# Altium PCB Sampler_DIOT.PCBDOC (part 7 of 11)
Units mm, origin at the board's own origin, x right, y up, seen from the top; angles counter-clockwise.
Board outline 222.9 x 100 mm, 4 copper layers (L1, P2, L3, L4), stack 1.6 mm thick; 754 components, 442 nets, 2347 pads, 1230 vias.
Unrouted connection lines stored in the file: 10.
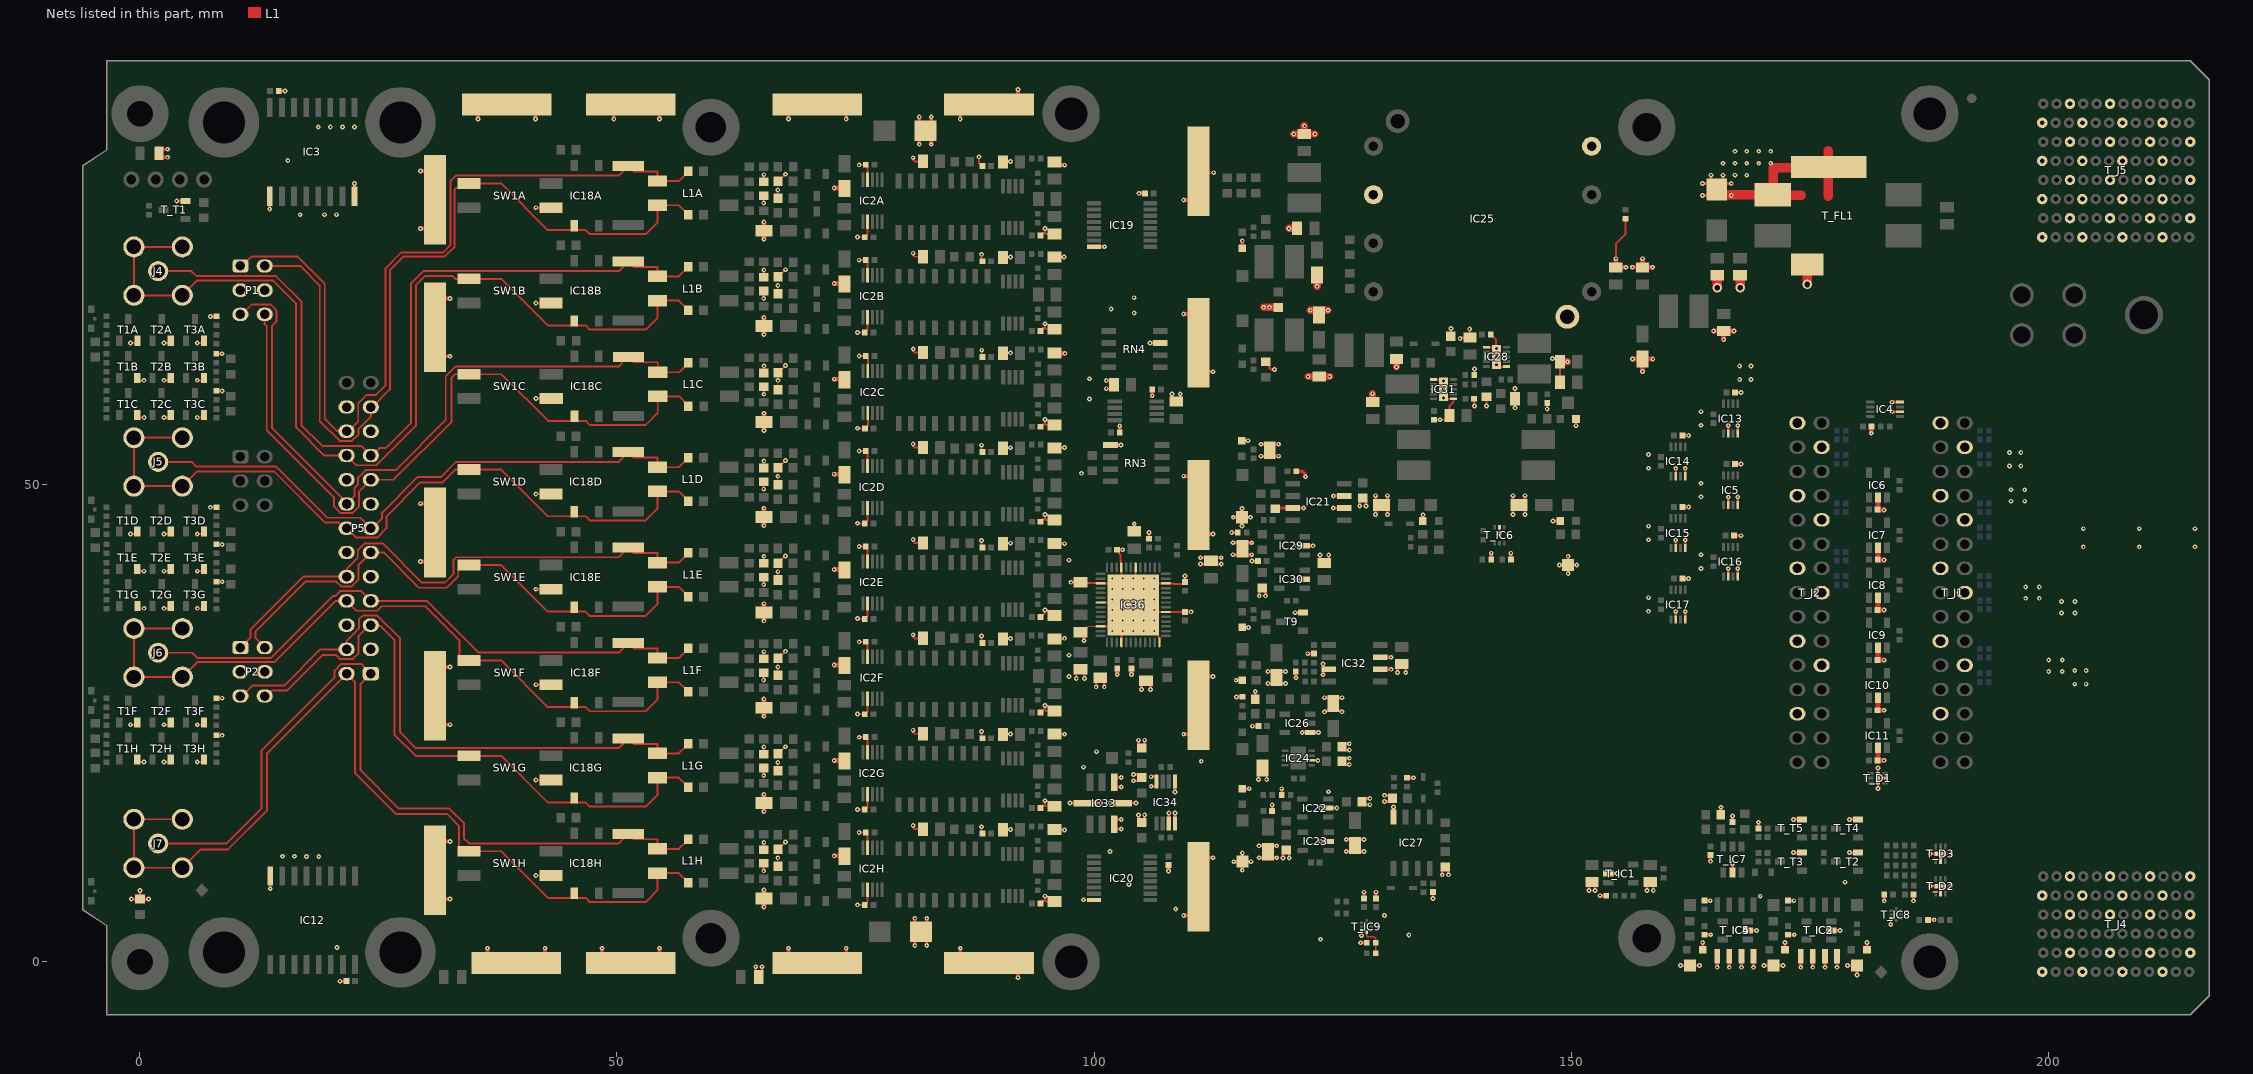
[diagram p8: the nets of this part, all layers, seen from the top]

## Via types
v1: diameter 0.5, hole 0.2, L1 to L4, tented both sides, 1208 vias
v2: diameter 1, hole 0.6, L1 to L4, tented both sides, 16 vias
v3: diameter 0.6, hole 0.3, L1 to L4, tented both sides, 6 vias

## Nets (pads, with @x,y where several pads share a name; then routed paths per layer and width w, separated by ;. In a path a pad name is that pad's centre, name@x,y a point inside that pad or via, vN(x,y) a via of type N, cw(c..) or ccw(c..) an arc to the next point about the centre after c; other vN are vias at no path point) (continued)
GND: C1A.1 C1B.1 C1C.1 C1D.1 C1E.1 C1F.1 C1G.1 C1H.1 C3A.1 C3B.1 C3C.1 C3D.1 C3E.1 C3F.1 C3G.1 C3H.1 C4A.1 C4B.1 C4C.1 C4D.1 C4E.1 C4F.1 C4G.1 C4H.1 C5A.1 C5B.1 C5C.1 C5D.1 C5E.1 C5F.1 C5G.1 C5H.1 C7A.2 C7B.2 C7C.2 C7D.2 C7E.2 C7F.2 C7G.2 C7H.2 C8A.2 C8B.2 C8C.2 C8D.2 C8E.2 C8F.2 C8G.2 C8H.2 C9A.1 C9B.1 C9C.1 C9D.1 C9E.1 C9F.1 C9G.1 C9H.1 C10A.1 C10B.1 C10C.1 C10D.1 C10E.1 C10F.1 C10G.1 C10H.1 C11A.1 C11B.1 C11C.1 C11D.1 C11E.1 C11F.1 C11G.1 C11H.1 C12A.1 C12B.1 C12C.1 C12D.1 C12E.1 C12F.1 C12G.1 C12H.1 C13A.1 C13B.1 C13C.1 C13D.1 C13E.1 C13F.1 C13G.1 C13H.1 C14A.1 C14B.1 C14C.1 C14D.1 C14E.1 C14F.1 C14G.1 C14H.1 C15.1 C16.1 C17.1 C18.1 C19.1 C20.1 C21.1 C22.1 C23.1 C24.1 C25.1 C26.1 C27.1 C28.1 C29.1 C30.1 C31.1 C32.1 C33.1 C37.1 C38.2 C39.1 C41.1 C43.1 C44.2 C45.1 C47.2 C48.1 C49.1 C50.2 C51.1 C52.2 C53.1 C54.1 C55.1 C56.1 C57.1 C58.1 C59.1 C60.1 C61.1 C62.1 C63.1 C64.1 C65.1 C66.1 C67.2 C68.1 C69.1 C70.1 C71.1 C72.1 C73.1 C74.1 C76.1 C77.2 C78.1 C79.1 C80.2 C81.1 C83.1 C84.2 C85.1 C86.1 C87.1 C88.1 C89.1 C90.1 C91.1 C92.1 C93.1 C94.1 C95.1 C96.1 C97.1 C98.1 C99.1 C100.1 C101.1 C102.1 C103.1 C104.1 C105.1 C106.1 CLIP1.1 CLIP2.1 CLIP3.1 CLIP4.1 CLIP5.1 CLIP6.1 CLIP7.1 CLIP8.1 CLIP9.1 CLIP10.1 CLIP11.1 CLIP12.1 CLIP13.1 CLIP14.1 CLIP15.1 CLIP16.1 CLIP17.1 CLIP18.1 D5.2 D6.1 IC2A.2 IC2A.9 IC2B.2 IC2B.9 IC2C.2 IC2C.9 IC2D.2 IC2D.9 IC2E.2 IC2E.9 IC2F.2 IC2F.9 IC2G.2 IC2G.9 IC2H.2 IC2H.9 IC3.1 IC3.8 IC4.2 IC4.4 IC5.2 IC5.4 IC6.2 IC7.2 IC8.2 IC9.2 IC10.2 IC11.2 IC12.8 IC13.2 IC13.4 IC14.2 IC14.4 IC15.2 IC15.4 IC16.2 IC16.4 IC17.2 IC17.4 IC19.8 IC20.8 IC21.3 IC21.6 IC21.7 IC22.2 IC23.2 IC24.6 IC25.3 IC25.5 IC25.8 IC26.1 IC27.4 IC28.1 IC28.6 IC28.11 IC29.2 IC30.2 IC31.1 IC31.6 IC31.11 IC32.3 IC32.6 IC32.7 IC33.3 IC33.4 IC33.5 IC33.8 IC34.3 IC34.4 IC34.5 IC34.8 IC36.3 IC36.7 IC36.12 IC36.18 IC36.26 IC36.32 IC36.38 IC36.46 IC36.49 IC36.53 LD1.1 LD2.1 LD3.1 LD4.1 LD5.1 LD6.1 LD7.1 LD8.1 LD9.1 LD10.1 LD11.1 P1.3 P1.4 P2.3 P2.4 P5.3 P5.6 P5.9 P5.12 P5.15 P5.18 P5.21 P5.24 R4A.1 R4B.1 R4C.1 R4D.1 R4E.1 R4F.1 R4G.1 R4H.1 R11A.1 R11B.1 R11C.1 R11D.1 R11E.1 R11F.1 R11G.1 R11H.1 R33A.1 R33B.1 R33C.1 R33D.1 R33E.1 R33F.1 R33G.1 R33H.1 R35.1 R52.1 R55.1 R57.1 R62.1 R63.1 R68.1 R71.1 R74.1 R92.2 R94.2 RN3.1 RN4.7 SW1A.3 SW1B.3 SW1C.3 SW1D.3 SW1E.3 SW1F.3 SW1G.3 SW1H.3 T1A.2 T1B.2 T1C.2 T1D.2 T1E.2 T1F.2 T1G.2 T1H.2 T2A.2 T2B.2 T2C.2 T2D.2 T2E.2 T2F.2 T2G.2 T2H.2 T3A.2 T3B.2 T3C.2 T3D.2 T3E.2 T3F.2 T3G.2 T3H.2 T9.2 T_C1.1 T_C2.1 T_C3.1 T_C4.1 T_C5.1 T_C6.1 T_C8.1 T_C9.1 T_C10.1 T_C12.1 T_C13.2 T_C16.1 T_C20.1 T_C22.1 T_C23.1 T_C24.1 T_C25.1 T_D1.2 T_D1.7 T_D2.2 T_D2.7 T_D3.2 T_D3.7 T_D5.2 T_FL1.4 T_IC1.2 T_IC2.2 T_IC3.1 T_IC3.2 T_IC3.3 T_IC3.4 T_IC4.2 T_IC5.1 T_IC5.2 T_IC5.3 T_IC5.4 T_IC6.2 T_IC7.2 T_IC8.4 T_IC9.4 T_J1.1 T_J1.4 T_J1.7 T_J1.10 T_J1.13 T_J1.16 T_J1.19 T_J1.22 T_J1.25 T_J2.1 T_J2.4 T_J2.7 T_J2.10 T_J2.13 T_J2.16 T_J2.19 T_J2.22 T_J2.25 T_J4.A2 T_J4.A4 T_J4.A6 T_J4.C1 T_J4.C5 T_J4.D2 T_J4.D4 T_J4.D6 T_J4.F1 T_J4.F5 T_J4.G2 T_J4.G4 T_J4.G6 T_J4.I1 T_J4.I5 T_J4.J2 T_J4.J4 T_J4.J6 T_J4.L1 T_J4.L5 T_J5.A2 T_J5.A4 T_J5.A6 T_J5.C1 T_J5.C3 T_J5.C5 T_J5.C7 T_J5.D2 T_J5.D4 T_J5.D6 T_J5.F1 T_J5.F3 T_J5.F5 T_J5.F7 T_J5.G2 T_J5.G4 T_J5.G6 T_J5.G8 T_J5.I1 T_J5.I3 T_J5.I5 T_J5.I7 T_J5.J2 T_J5.J4 T_J5.J6 T_J5.J8 T_J5.L1 T_J5.L3 T_J5.L5 T_J5.L7 T_R6.1 T_R7.1 T_R9.1 T_R19.1 T_R25.1 T_R26.2 T_R27.2 T_T1.2 T_T2.2 T_T3.2 T_T4.2 T_T5.2 TP3.1 TP4.1 TP5.1 TP6.1 TP14.1 TP16.1 | length 573.9
  L1 w0.127: C5H.1@66.862,10.02 v1(66.862,10.897) ; C5G.1@66.862,20.02 v1(66.862,20.897) ; C5F.1@66.862,30.02 v1(66.862,30.897) ; C5E.1@66.862,40.02 v1(66.862,40.897) ; C5D.1@66.862,50.02 v1(66.862,50.897) ; C5B.1@66.862,70.02 v1(66.862,70.897) ; C5A.1@66.862,80.02 v1(66.862,80.897) ; C5C.1@66.875,60.076 v1(66.875,60.953) ; C96.1@98.569,34.566 98.78,34.566 99.396,35.182 100.001,35.182 100.022,35.161 100.685,35.161 IC36.12@100.689,35.165 ; v1(98.897,6.508) 99.977,6.508 IC20.8@99.999,6.487
  L1 w0.203: v1@-0.997,24.846 v1@-0.99,24.854 ; v1@-0.997,44.846 v1@-0.99,44.854 ; v1@-0.997,64.846 v1@-0.99,64.854 ; v1@-0.99,24.85 -0.533,24.85 T1F.2@-0.283,25.1 ; v1@-0.99,44.85 -0.533,44.85 T1D.2@-0.283,45.1 ; v1@-0.99,64.85 -0.533,64.85 T1A.2@-0.283,65.1 ; T1H.2@-0.28,21.2 -0.03,20.95 v1@0.426,20.95 ; T1E.2@-0.28,41.2 -0.03,40.95 v1@0.426,40.95 ; T1B.2@-0.28,61.2 -0.03,60.95 v1@0.426,60.95 ; T1G.2@-0.275,37.3 -0.025,37.05 v1@0.431,37.05 ; T1C.2@-0.275,57.3 -0.025,57.05 v1@0.431,57.05 ; v1@0.426,20.954 v1@0.433,20.946 ; v1@0.426,40.954 v1@0.433,40.946 ; v1@0.426,60.954 v1@0.433,60.946 ; v1@0.431,37.053 v1@0.438,37.046 ; v1@0.431,57.054 v1@0.438,57.046 ; v1@2.503,24.846 v1@2.51,24.854 ; v1@2.503,44.846 v1@2.51,44.854 ; v1@2.503,64.846 v1@2.51,64.854 ; v1@2.506,20.946 v1@2.513,20.954 ; v1@2.506,40.946 v1@2.513,40.954 ; v1@2.506,60.946 v1@2.513,60.954 ; v1@2.51,24.85 2.967,24.85 T2F.2@3.217,25.1 ; v1@2.51,44.85 2.967,44.85 T2D.2@3.217,45.1 ; v1@2.51,64.85 2.967,64.85 T2A.2@3.217,65.1 ; v1@2.512,37.046 v1@2.519,37.053 ; v1@2.512,57.046 v1@2.519,57.054 ; v1@2.513,20.95 2.97,20.95 T2H.2@3.22,21.2 ; v1@2.513,40.95 2.97,40.95 T2E.2@3.22,41.2 ; v1@2.513,60.95 2.97,60.95 T2B.2@3.22,61.2 ; v1@2.519,37.05 2.975,37.05 T2G.2@3.225,37.3 ; v1@2.519,57.05 2.975,57.05 T2C.2@3.225,57.3 ; v1@6.003,24.846 v1@6.01,24.854 ; v1@6.003,44.846 v1@6.01,44.854 ; v1@6.003,64.846 v1@6.01,64.854 ; v1@6.006,20.946 v1@6.013,20.954 ; v1@6.006,40.946 v1@6.013,40.954 ; v1@6.006,60.946 v1@6.013,60.954 ; v1@6.01,24.85 6.467,24.85 T3F.2@6.717,25.1 ; v1@6.01,44.85 6.467,44.85 T3D.2@6.717,45.1 ; v1@6.01,64.85 6.467,64.85 T3A.2@6.717,65.1 ; v1@6.012,37.046 v1@6.019,37.053 ; v1@6.012,57.046 v1@6.019,57.054 ; v1@6.013,20.95 6.47,20.95 T3H.2@6.72,21.2 ; v1@6.013,40.95 6.47,40.95 T3E.2@6.72,41.2 ; v1@6.013,60.95 6.47,60.95 T3B.2@6.72,61.2 ; v1@6.019,37.05 6.475,37.05 T3G.2@6.725,37.3 ; v1@6.019,57.05 6.475,57.05 T3C.2@6.725,57.3 ; v1(7.387,47.638) 7.394,47.645 R33D.1@8,47.645 ; v1(7.387,67.638) 7.394,67.645 R33A.1@8,67.645 ; R33B.1@7.994,63.745 8.601,63.745 v1(8.608,63.738) ; R33H.1@8,23.745 8.606,23.745 v1(8.613,23.738) ; R33F.1@8,27.645 8.606,27.645 v1(8.613,27.638) ; R33G.1@8,39.845 8.606,39.845 v1(8.613,39.838) ; R33E.1@8,43.745 v1@8.606,43.745 ; R33C.1@8,59.845 8.606,59.845 v1(8.613,59.838) ; v1@13.602,78.912 v1@13.609,78.919 ; v1@13.651,7.662 v1@13.659,7.669 ; v1@15.199,91.271 v1@15.206,91.264 ; v1@20.974,-2.027 v1@20.981,-2.034 ; v1@22.492,81.581 v1@22.499,81.588 ; v1@29.401,41.971 v1@29.409,41.979 ; v1@29.401,48.029 v1@29.409,48.021 ; v1@29.401,76.851 v1@29.409,76.859 ; v1@29.401,82.909 v1@29.409,82.901 ; v1@32.479,6.579 v1@32.487,6.571 ; v1@32.479,12.621 v1@32.487,12.629 ; v1@32.479,24.859 v1@32.487,24.851 ; v1@32.479,30.901 v1@32.487,30.909 ; v1@32.479,63.479 v1@32.487,63.471 ; v1@32.479,69.521 v1@32.487,69.529 ; v1@35.415,88.337 v1@35.423,88.345 ; v1@36.415,1.423 v1@36.423,1.415 ; v1@41.465,88.345 v1@41.473,88.337 ; v1@42.465,1.415 v1@42.473,1.423 ; v1@48.415,1.423 v1@48.423,1.415 ; v1@49.665,88.337 v1@49.673,88.345 ; v1@54.465,1.415 v1@54.473,1.423 ; v1@54.465,88.345 v1@54.473,88.337 ; v1(65.376,9.54) R11H.1@65.376,10.312 ; R4H.1@65.376,11.76 v1@65.376,12.52 ; v1(65.376,19.54) R11G.1@65.376,20.312 ; R4G.1@65.376,21.76 v1@65.376,22.52 ; v1(65.376,29.54) R11F.1@65.376,30.312 ; R4F.1@65.376,31.76 v1@65.376,32.52 ; v1(65.376,39.54) R11E.1@65.376,40.312 ; R4E.1@65.376,41.76 v1@65.376,42.52 ; v1(65.376,49.54) R11D.1@65.376,50.312 ; R4D.1@65.376,51.76 v1@65.376,52.52 ; v1(65.376,69.54) R11B.1@65.376,70.312 ; R4B.1@65.376,71.76 v1@65.376,72.52 ; v1(65.376,79.54) R11A.1@65.376,80.312 ; R4A.1@65.376,81.76 v1@65.376,82.52 ; v1(65.389,59.496) R11C.1@65.389,60.268 ; R4C.1@65.389,61.716 v1@65.389,62.476 ; C1H.1@66.862,11.798 v1@67.612,12.548 ; C1G.1@66.862,21.798 v1@67.612,22.548 ; C1F.1@66.862,31.798 v1@67.612,32.548 ; C1E.1@66.862,41.798 v1@67.612,42.548 ; C1D.1@66.862,51.798 v1@67.612,52.548 ; C1B.1@66.862,71.798 v1@67.612,72.548 ; C1A.1@66.862,81.798 v1@67.612,82.548 ; C1C.1@66.875,61.754 v1@67.625,62.504 ; v1@67.971,1.423 v1@67.979,1.415 ; v1@67.971,88.337 v1@67.979,88.345 ; C8H.2@73.773,11.113 C8H.2@73.829,11.058 ; C8G.2@73.773,21.113 C8G.2@73.829,21.058 ; v1@74.021,1.415 v1@74.029,1.423 ; v1@74.021,88.345 v1@74.029,88.337 ; v1(75.199,5.974) 75.224,5.948 C10H.1@75.965,5.948 76.275,6.258 IC2H.2@76.275,7.567 ; v1(75.199,15.974) 75.224,15.948 C10G.1@75.965,15.948 76.275,16.258 IC2G.2@76.275,17.567 ; v1(75.199,25.974) 75.224,25.948 C10F.1@75.965,25.948 76.275,26.258 IC2F.2@76.275,27.567 ; v1(75.199,35.974) 75.224,35.948 C10E.1@75.965,35.948 76.275,36.258 IC2E.2@76.275,37.567 ; v1(75.199,45.974) 75.224,45.948 C10D.1@75.965,45.948 76.275,46.258 IC2D.2@76.275,47.567 ; v1(75.199,65.974) 75.224,65.948 C10B.1@75.965,65.948 76.275,66.258 IC2B.2@76.275,67.567 ; v1(75.199,75.974) 75.224,75.948 C10A.1@75.965,75.948 76.275,76.258 IC2A.2@76.275,77.567 ; v1(75.211,55.93) 75.237,55.904 C10C.1@75.978,55.904 76.288,56.214 IC2C.2@76.288,57.523 ; v1(75.387,13.543) 75.394,13.55 C9H.1@76.075,13.55 ; v1(75.387,23.543) 75.394,23.55 C9G.1@76.075,23.55 ; v1(75.387,33.543) 75.394,33.55 C9F.1@76.075,33.55 ; v1(75.387,43.543) 75.394,43.55 C9E.1@76.075,43.55 ; v1(75.387,53.543) 75.394,53.55 C9D.1@76.075,53.55 ; v1(75.387,63.493) 75.394,63.5 C9C.1@76.075,63.5 ; v1(75.387,73.543) 75.394,73.55 C9B.1@76.075,73.55 ; v1(75.387,83.543) 75.394,83.55 C9A.1@76.075,83.55 ; C9H.1@76.065,13.448 76.275,13.238 IC2H.9@76.275,11.967 ; C9G.1@76.065,23.448 76.275,23.238 IC2G.9@76.275,21.967 ; C9F.1@76.065,33.448 76.275,33.238 IC2F.9@76.275,31.967 ; C9E.1@76.065,43.448 76.275,43.238 IC2E.9@76.275,41.967 ; C9D.1@76.065,53.448 76.275,53.238 IC2D.9@76.275,51.967 ; C9B.1@76.065,73.448 76.275,73.238 IC2B.9@76.275,71.967 ; C9A.1@76.065,83.448 76.275,83.238 IC2A.9@76.275,81.967 ; C9C.1@76.078,63.404 76.288,63.194 IC2C.9@76.288,61.923 ; v1(81.044,14.28) 81.044,14.055 81.194,13.905 C3H.1@82.069,13.905 ; v1(81.044,24.28) 81.044,24.055 81.194,23.905 C3G.1@82.069,23.905 ; v1(81.044,34.28) 81.044,34.055 81.194,33.905 C3F.1@82.069,33.905 ; v1(81.044,44.28) 81.044,44.055 81.194,43.905 C3E.1@82.069,43.905 ; v1(81.044,54.28) 81.044,54.055 81.194,53.905 C3D.1@82.069,53.905 ; v1(81.044,74.28) 81.044,74.055 81.194,73.905 C3B.1@82.069,73.905 ; v1(81.044,84.28) 81.044,84.055 81.194,83.905 C3A.1@82.069,83.905 ; v1(81.057,64.236) 81.057,64.011 81.207,63.861 C3C.1@82.082,63.861 ; v1@85.971,1.423 v1@85.979,1.415 ; v1@85.971,88.337 v1@85.979,88.345 ; v1(87.944,84.38) 87.944,83.78 C13A.1@88.294,83.43 ; v1(88.219,14.155) 88.219,13.505 C13H.1@88.294,13.43 ; v1(88.219,24.155) 88.219,23.505 C13G.1@88.294,23.43 ; v1(88.219,34.155) 88.219,33.505 C13F.1@88.294,33.43 ; v1(88.219,44.155) 88.219,43.505 C13E.1@88.294,43.43 ; v1(88.219,54.155) 88.219,53.505 C13D.1@88.294,53.43 ; v1(88.219,74.155) 88.219,73.505 C13B.1@88.294,73.43 ; v1(88.232,64.111) 88.232,63.461 C13C.1@88.307,63.386 ; C12H.1@90.444,13.83 90.494,13.88 v1(91.244,13.88) ; C12G.1@90.444,23.83 90.494,23.88 v1(91.244,23.88) ; C12F.1@90.444,33.83 90.494,33.88 v1(91.244,33.88) ; C12E.1@90.444,43.83 90.494,43.88 v1(91.244,43.88) ; C12D.1@90.444,53.83 90.494,53.88 v1(91.244,53.88) ; C12B.1@90.444,73.83 90.494,73.88 v1(91.244,73.88) ; C12A.1@90.444,83.83 90.494,83.88 v1(91.244,83.88) ; C12C.1@90.457,63.786 90.507,63.836 v1(91.257,63.836) ; v1@92.021,-1.655 v1@92.029,-1.663 ; v1@92.021,91.415 v1@92.029,91.423 ; C14H.1@94.394,6.13 94.469,6.205 94.469,6.33 94.545,6.406 94.853,6.406 ; C14G.1@94.394,16.13 94.494,16.23 94.494,16.38 94.827,16.38 94.853,16.406 ; C14F.1@94.394,26.13 94.762,26.498 94.853,26.406 ; C14D.1@94.394,46.13 94.619,46.355 94.619,46.405 94.62,46.406 94.853,46.406 ; C14B.1@94.394,66.13 94.594,66.33 94.594,66.43 94.829,66.43 94.853,66.406 ; C14A.1@94.394,76.13 94.569,76.305 94.569,76.38 94.595,76.406 94.853,76.406 ; C14C.1@94.407,56.086 94.683,56.362 94.866,56.362 ; v1@94.807,36.867 94.807,36.543 C14E.1@94.394,36.13 94.419,36.13 94.823,36.534 94.823,36.85 v1(94.853,36.88) 94.961,36.988 95.643,36.306 C4E.1@95.853,36.306 ; v1(94.853,6.88) 94.853,6.406 ; v1(94.853,16.88) 94.853,16.406 ; v1(94.853,26.88) 94.853,26.406 ; v1(94.853,46.88) 94.853,46.406 ; v1(94.853,66.88) 94.853,66.406 ; v1(94.853,76.88) 94.853,76.406 ; v1(94.866,56.836) 94.866,56.362 ; C4H.1@95.853,6.306 94.953,6.306 94.853,6.406 ; C7H.2@95.853,13.856 96.893,13.856 v1(96.919,13.83) ; C4G.1@95.853,16.306 94.953,16.306 94.853,16.406 ; C7G.2@95.853,23.856 96.893,23.856 v1(96.894,23.855) ; C4F.1@95.853,26.306 94.953,26.306 94.853,26.406 ; C7F.2@95.853,33.856 96.87,33.856 v1(96.919,33.905) ; C7E.2@95.853,43.856 96.868,43.856 v1(96.894,43.83) ; C4D.1@95.853,46.306 94.953,46.306 94.853,46.406 ; C7D.2@95.853,53.856 96.845,53.856 v1(96.894,53.905) ; C4B.1@95.853,66.306 94.953,66.306 94.853,66.406 ; C7B.2@95.853,73.856 96.82,73.856 v1(96.844,73.88) ; C4A.1@95.853,76.306 94.953,76.306 94.853,76.406 ; C7A.2@95.853,83.856 C7A.2@95.951,83.954 ; C4C.1@95.866,56.262 94.966,56.262 94.866,56.362 ; C7C.2@95.866,63.812 C7C.2@95.898,63.78 ; v1@96.912,63.812 v1(96.944,63.78) ; v1(97.569,39.78) 97.584,39.795 C97.1@98.569,39.795 98.64,39.725 100.217,39.725 100.276,39.665 101.864,39.665 IC36.53@102.864,38.665 ; IC36.12@100.689,35.165 101.864,35.165 IC36.53@102.864,36.165 ; IC36.7@100.689,37.665 IC36.53@103.864,37.665 ; C90.1@102.4,43.197 102.608,42.988 102.608,42.813 102.798,42.623 102.798,41.968 102.855,41.911 102.855,41.349 IC36.49@102.864,41.34 IC36.53@102.864,38.665 ; IC36.18@102.864,33.49 IC36.53@102.864,36.165 ; C98.1@104.215,45.121 v1(104.215,45.921) ; IC36.46@104.364,41.34 IC36.53@104.364,37.665 ; IC34.8@106.496,18.881 IC34.8@106.582,18.967 ; IC36.26@106.864,33.49 106.855,33.499 106.855,33.949 106.717,34.087 106.717,34.317 106.369,34.665 v1(106.314,34.665) v1(105.214,35.765) v1(104.114,36.865) IC36.53@104.114,37.415 ; IC34.4@108.494,14.505 IC34.4@108.495,14.506 ; v1@109.401,4.851 v1@109.409,4.859 ; v1@109.401,23.851 v1@109.409,23.859 ; v1@109.401,50.909 v1@109.409,50.901 ; v1@109.401,67.909 v1@109.409,67.901 ; v1@109.401,79.851 v1@109.409,79.859 ; C93.1@109.444,39.88 109.444,39.722 109.325,39.603 108.373,39.603 108.311,39.665 106.364,39.665 IC36.53@104.364,37.665 ; C92.1@109.694,36.505 109.534,36.665 IC36.32@107.539,36.665 104.864,36.665 IC36.53@104.114,37.415 ; CLIP12.1@110.269,48.555 CLIP12.1@110.944,47.88 ; CLIP11.1@110.944,82.88 111.109,82.715 v1(112.541,82.715) ; C94.1@112.162,41.94 C94.1@112.252,42.03 ; v1@112.479,10.901 v1@112.487,10.909 ; v1@112.479,29.901 v1@112.487,29.909 ; v1@112.479,44.859 v1@112.487,44.851 ; v1@112.479,61.859 v1@112.487,61.851 ; v1@131.377,16.22 v1@131.385,16.228 ; IC31.6@135.591,61.02 136.141,61.02 136.641,60.52 v3(136.641,60.02) 136.641,59.445 137.141,58.945 137.216,59.02 IC31.1@137.691,59.02 137.691,58.695 137.241,58.245 C86.1@137.241,57.27 137.066,57.095 137.066,56.82 v1(136.266,56.82) C78.1@135.641,56.82 ; C66.1@137.391,65.57 137.391,66.37 v1(137.416,66.395) ; v1(138.378,65.34) 138.494,65.455 C74.1@139.409,65.455 139.409,66.309 v1(139.378,66.34) ; C85.1@139.841,59.02 139.841,58.32 v1(139.891,58.27) ; R74.1@139.861,61.52 139.861,62.115 v1(139.891,62.145) ; v1(141.141,58.27) R68.1@141.141,59.22 ; IC28.1@141.142,64.415 141.824,64.415 IC28.11@142.192,64.046 ; C73.1@141.591,65.77 142.125,65.236 142.125,64.35 v3(142.192,64.282) IC28.11@142.192,64.046 ; v3(142.192,62.59) 142.442,62.34 143.168,62.34 IC28.6@143.242,62.415 ; v3(142.192,63.415) IC28.11@142.192,64.046 ; v1(144.128,58.068) 144.148,58.088 144.148,60.071 v1(144.128,60.09) ; v1(147.5,57.95) 147.512,57.962 C69.1@147.512,58.594 ; v1(148.046,63.248) 148.506,63.248 C55.1@148.853,62.901 C56.1@148.853,60.742 ; C53.1@154.694,72.78 154.694,75.246 155.694,76.246 R57.1@155.694,77.91 ; IC36.53@102.864,36.165 IC36.53@104.114,37.415 ; IC36.53@102.864,38.665 IC36.53@103.864,37.665 ; IC36.53@103.864,37.665 IC36.53@104.114,37.415 ; IC36.53@104.114,37.415 IC36.53@104.364,37.665
  L1 w0.25: v1(41.489,9.05) SW1H.3@43.086,9.05 ; v1(41.489,19.05) SW1G.3@43.086,19.05 ; v1(41.489,29.05) SW1F.3@43.086,29.05 ; v1(41.489,39.05) SW1E.3@43.086,39.05 ; v1(41.489,49.05) SW1D.3@43.086,49.05 ; v1(41.489,69.05) SW1B.3@43.086,69.05 ; v1(41.489,79.05) SW1A.3@43.086,79.05 ; v1(41.502,59.05) SW1C.3@43.099,59.05 ; R94.2@118,62.89 118.041,62.89 118.366,62.565 118.366,62.276 118.552,62.09 118.923,62.09 v1(118.929,62.083) ; IC24.6@122.812,21.11 123.461,21.11 v1(123.463,21.108) ; v1@128.026,2.645 T_IC9.4@128.026,3.296 ; v1(142.5,44.887) T_IC6.2@142.5,45.538 ; v1(182.177,18.174) T_D1.7@182.177,19.25 v1(182.177,20.326) ; T_D1.7@182.252,19.25 T_D1.2@182.937,19.25 ; v1(183.517,3.9) T_IC8.4@183.517,4.552 ; v1(187.654,7.933) T_D2.7@188.731,7.933 v1(189.807,7.933) ; v1(187.654,11.332) T_D3.7@188.731,11.332 v1(189.807,11.332) ; T_D2.2@188.731,7.173 T_D2.7@188.731,7.858 ; T_D3.2@188.731,10.572 T_D3.7@188.731,11.257
  L1 w0.3: v1@13.605,78.919 IC3.1@13.605,80.25 ; v1@13.655,7.669 IC12.8@13.655,9 ; C15.1@14.543,91.268 v1@15.199,91.268 ; v1@20.981,-2.031 C31.1@21.638,-2.031 ; IC3.8@22.495,80.25 v1@22.495,81.581 ; T_R27.2@64.539,-1.071 v1(64.539,-0.518) ; T_R27.2@65.189,-1.071 v1(65.189,-0.518) ; v1(97.492,16.634) IC33.8@98.594,16.634 ; v1(98.144,29.707) C99.1@98.144,30.259 ; v1(98.994,29.707) C99.1@98.994,30.259 ; IC33.8@99.594,16.634 v1(100.696,16.634) ; v1(100.23,28.822) C91.1@100.23,29.374 ; v1(101.08,28.822) C91.1@101.08,29.374 ; v1(101.29,60.075) C106.1@101.842,60.075 ; v1(101.29,60.925) C106.1@101.842,60.925 ; v1(101.692,16.634) IC33.4@102.794,16.634 ; IC33.3@102.307,13.914 v1(102.859,13.914) ; IC33.3@102.307,14.916 v1(102.859,14.916) ; IC33.5@102.307,18.314 v1(102.859,18.314) ; IC33.5@102.307,19.316 v1(102.859,19.316) ; IC33.4@103.294,16.634 v1(104.396,16.634) ; v1(104.148,18.975) C102.1@104.7,18.975 ; v1(104.148,19.625) C102.1@104.7,19.625 ; C101.1@104.658,14.836 v1(104.658,15.389) ; C100.1@104.658,22.683 v1(104.658,23.235) ; v1(104.969,28.545) C95.1@104.969,29.097 ; C101.1@105.308,14.836 v1(105.308,15.389) ; C100.1@105.308,22.683 v1(105.308,23.235) ; v1(105.919,28.545) C95.1@105.919,29.097 ; v1(105.994,18.404) IC34.8@106.546,18.404 ; v1(105.994,19.406) IC34.8@106.546,19.406 ; IC34.3@107.844,14.506 v1(107.844,15.608) ; C103.1@108.186,58.97 v1(108.186,59.523) ; v1(108.494,17.803) IC34.5@108.494,18.905 ; IC34.4@108.495,14.506 v1(108.495,15.608) ; C103.1@109.036,58.97 v1(109.036,59.523) ; v1(111.167,41.705) C94.1@111.719,41.705 ; v1(111.167,42.355) C94.1@111.719,42.355 ; C94.1@112.785,41.705 v1(113.337,41.705) ; C94.1@112.785,42.355 v1(113.337,42.355) ; R63.1@116.9,27.783 v1(116.9,28.335) ; v1(117.25,19.115) C63.1@117.25,19.667 ; v1(117.325,38.365) C71.1@117.325,38.917 ; v1(117.975,38.365) C71.1@117.975,38.917 ; v1(118.1,19.115) C63.1@118.1,19.667 ; R52.1@118.993,47.469 119.092,47.568 IC21.3@120.834,47.568 ; v1(119.819,10.884) C41.1@119.819,11.436 ; v1(120.469,10.884) C41.1@120.469,11.436 ; C68.1@123.7,42.083 v1(123.7,42.635) ; C68.1@124.6,42.083 v1(124.6,42.635) ; C26.1@126.211,20.685 v1(126.763,20.685) ; C26.1@126.211,21.335 v1(126.763,21.335) ; C61.1@126.211,22.21 v1(126.763,22.21) ; C61.1@126.211,22.86 v1(126.763,22.86) ; v1(127.854,47.774) C37.1@127.854,48.326 ; C43.1@128.358,16.475 v1(128.91,16.475) ; C43.1@128.358,17.125 v1(128.91,17.125) ; v1(128.504,47.774) C37.1@128.504,48.326 ; v1(130.44,16.8) C65.1@130.992,16.8 ; v1(130.44,17.45) C65.1@130.992,17.45 ; v1(131.825,30.315) C81.1@131.825,30.867 ; v1(132.675,30.315) C81.1@132.675,30.867 ; v1(136.5,9.115) C72.1@136.5,9.667 ; v1(137.15,9.115) C72.1@137.15,9.667 ; v1(151.875,7.465) T_C1.1@151.875,8.017 ; v1(152.525,7.465) T_C1.1@152.525,8.017 ; v1(157.975,7.465) T_C2.1@157.975,8.017 ; v1(158.625,7.465) T_C2.1@158.625,8.017 ; IC17.2@160.977,35.895 v1(160.977,36.725) ; IC15.2@160.977,43.394 v1(160.977,44.225) ; IC14.2@160.978,50.894 v1(160.978,51.724) ; IC17.4@161.977,35.895 v1(161.977,36.725) ; IC15.4@161.977,43.394 v1(161.977,44.225) ; IC14.4@161.978,50.894 v1(161.978,51.724) ; IC16.2@166.478,40.395 v1(166.478,41.225) ; IC5.2@166.478,47.894 v1(166.478,48.725) ; IC13.2@166.478,55.394 v1(166.478,56.224) ; IC16.4@167.478,40.395 v1(167.478,41.225) ; IC5.4@167.478,47.894 v1(167.478,48.725) ; IC13.4@167.478,55.394 v1(167.478,56.224) ; v1(183.637,57.664) IC4.2@184.467,57.664 ; v1(183.637,58.664) IC4.4@184.467,58.664
  L1 w0.35: v1(-0.905,6.575) T_C12.1@0,6.575 ; v1(0,7.48) T_C12.1@0,6.575 ; v1(0.905,6.575) T_C12.1@0,6.575 ; T_R26.2@2,84.323 v1(2.905,84.323) ; T_R26.2@2,85.173 v1(2.905,85.173) ; v1(3.845,79.757) T_T1.2@4.75,79.757 ; v1(81.219,1.7) D6.1@81.219,2.605 ; D6.1@81.219,3.655 v1(81.219,4.56) ; v1(81.694,85.7) D5.2@81.694,86.605 ; D5.2@81.694,87.655 v1(81.694,88.56) ; v1(82.469,1.7) D6.1@82.469,2.605 ; D6.1@82.469,3.655 v1(82.469,4.56) ; v1(82.944,85.7) D5.2@82.944,86.605 ; D5.2@82.944,87.655 v1(82.944,88.56) ; IC19.8@99.999,74.95 v1(101.101,74.95) ; C90.1@102.4,43.197 v1(103.001,43.197) ; C105.1@102.7,55.5 v1(102.7,56.151) ; C89.1@105.758,44.347 v1(105.758,44.998) ; v1(106.106,59.344) C104.1@106.106,59.995 ; C92.1@109.534,36.682 v1(110.185,36.682) ; C93.1@109.534,39.796 v1(109.534,40.448) ; v1(114.429,45) R71.1@115.08,45 ; v1(114.57,42.675) C77.2@115.475,42.675 ; v1(114.57,43.925) C77.2@115.475,43.925 ; v1(114.595,46.6) TP16.1@115.5,46.6 ; v1(114.645,10.5) TP14.1@115.55,10.5 ; v1(114.899,29.513) LD6.1@115.55,29.513 ; v1(114.924,27.77) R92.2@115.575,27.77 ; v1(115.5,45.695) TP16.1@115.5,46.6 ; v1(115.5,47.505) TP16.1@115.5,46.6 ; LD3.1@115.5,54.625 v1(116.151,54.625) ; v1(115.55,9.595) TP14.1@115.55,10.5 ; v1(115.55,11.405) TP14.1@115.55,10.5 ; LD11.1@115.55,35.05 v1(116.201,35.05) ; LD1.1@115.55,74.815 v1(115.55,75.573) ; LD4.1@115.625,18.15 v1(116.276,18.15) ; C77.2@115.625,42.675 v1(116.53,42.675) ; C77.2@115.625,43.925 v1(116.53,43.925) ; v1(116.405,46.6) TP16.1@115.5,46.6 ; v1(116.455,10.5) TP14.1@115.55,10.5 ; v1(116.549,42) C76.1@117.2,42 ; v1(116.599,24.7) C64.1@117.25,24.7 ; v1(117.295,10.907) C44.2@118.2,10.907 ; v1(117.295,12.157) C44.2@118.2,12.157 ; v1(117.495,53) C38.2@118.4,53 ; v1(117.495,54.25) C38.2@118.4,54.25 ; v1(118.22,29.175) C84.2@119.125,29.175 ; v1(118.22,30.425) C84.2@119.125,30.425 ; C44.2@118.25,10.907 v1(119.155,10.907) ; C44.2@118.25,12.157 v1(119.155,12.157) ; C38.2@118.45,53 v1(119.355,53) ; C38.2@118.45,54.25 v1(119.355,54.25) ; C45.1@118.675,15.8 v1(118.675,16.451) ; C84.2@119.175,29.175 v1(120.08,29.175) ; C84.2@119.175,30.425 v1(120.08,30.425) ; R55.1@119.674,17.5 v1(119.674,18.151) ; v1(121.067,36.6) T9.2@121.95,36.6 ; IC21.3@121.084,47.568 v1(121.99,47.568) ; v1(121.16,29.773) R35.1@121.16,30.424 ; C39.1@121.2,51.425 121.851,51.425 122.15,51.127 122.15,50.871 v1(122.179,50.842) ; v1(121.245,40.1) IC30.2@122.15,40.1 ; v1(121.245,43.6) v1(122.955,43.6) ; v1(121.832,24.047) v1(123.542,24.047) ; v1(122.395,32.3) C83.1@123.046,32.3 ; v1(123.739,12.619) IC23.2@124.644,12.619 ; v1(123.739,16.119) v1(125.449,16.119) ; v1(124.012,30.087) IC32.3@124.012,30.634 ; IC32.3@124.012,30.684 v1(124.012,31.232) ; v1(124.147,26.206) 124.188,26.206 124.317,26.335 124.953,26.335 C62.1@125.053,26.435 ; v1(124.147,27.685) C62.1@125.053,27.685 ; v1(125.079,47.568) IC21.6@125.984,47.568 ; v1(125.079,48.838) IC21.7@125.984,48.838 ; C62.1@125.103,26.435 125.203,26.335 125.839,26.335 125.967,26.206 v1(126.008,26.206) ; C62.1@125.103,27.685 v1(126.008,27.685) ; v1(126.445,11.575) C47.2@127.35,11.575 ; v1(126.445,12.825) C47.2@127.35,12.825 ; C47.2@127.4,11.575 v1(128.305,11.575) ; C47.2@127.4,12.825 v1(128.305,12.825) ; v1(127.929,2) T_R6.1@128.58,2 ; T_C25.1@128.3,6.646 v1(128.3,7.298) ; v1(129.519,46.9) C80.2@129.519,47.805 ; C80.2@129.519,47.955 v1(129.519,48.86) ; T_C24.1@129.55,6.646 v1(129.55,7.298) ; IC32.6@130.246,30.659 v1(131.152,30.659) ; IC32.7@130.246,31.929 v1(131.152,31.929) ; v1(130.769,46.9) C80.2@130.769,47.805 ; C80.2@130.769,47.955 v1(130.769,48.86) ; R62.1@132.825,19.29 v1(133.476,19.29) ; LD5.1@134.475,46.2 v1(134.475,46.851) ; v1(135.525,6.649) C29.1@135.525,7.3 ; T_R25.1@141.638,42.184 v1(141.638,42.835) ; T_C8.1@143.69,42.184 v1(143.69,42.836) ; v1(143.925,46.9) C67.2@143.925,47.805 ; C67.2@143.925,47.955 v1(143.925,48.86) ; v1(145.175,46.9) C67.2@145.175,47.805 ; C67.2@145.175,47.955 v1(145.175,48.86) ; v1(148.099,46.2) LD8.1@148.75,46.2 ; v1(148.795,41.6) TP3.1@149.7,41.6 ; v1(149.7,40.695) TP3.1@149.7,41.6 ; v1(149.7,42.505) TP3.1@149.7,41.6 ; v1(150.525,56.196) LD7.1@150.525,56.897 ; v1(150.605,41.6) TP3.1@149.7,41.6 ; v1(153.029,6.935) T_R7.1@153.68,6.935 ; T_IC1.2@153.925,9.25 v1(154.83,9.25) ; v1(161.47,-0.387) TP6.1@162.121,-0.387 ; C30.1@161.677,40.17 v1(162.329,40.17) ; C27.1@161.677,47.669 v1(162.329,47.669) ; C25.1@161.678,55.169 v1(162.329,55.169) ; TP6.1@162.809,-0.387 v1(163.461,-0.387) ; v1(163.795,80.325) T_D5.2@164.7,80.325 ; v1(163.795,81.575) T_D5.2@164.7,81.575 ; LD10.1@163.8,1.371 v1(163.8,2.022) ; T_C5.1@163.997,2.834 v1(164.648,2.834) ; T_C6.1@163.997,6.413 v1(164.598,6.413) v1@164.648,6.413 ; v1(164.61,10.535) T_C20.1@164.61,11.186 ; T_D5.2@164.675,81.55 v1(164.675,82.455) ; v1(165.323,-0.575) T_IC5.1@165.323,0.584 ; T_R9.1@165.71,15.55 v1(165.71,16.201) ; T_D5.2@165.9,80.325 v1(166.805,80.325) ; T_D5.2@165.9,81.575 v1(166.805,81.575) ; T_D5.2@165.925,81.55 v1(165.925,82.455) ; v1(166.593,-0.575) T_IC5.2@166.593,0.33 ; T_IC7.2@166.919,9.386 v1(166.919,10.291) ; T_C13.2@166.919,14.636 v1(166.919,15.287) ; C28.1@167.178,44.67 v1(167.829,44.67) ; C18.1@167.178,52.169 v1(167.829,52.169) ; C24.1@167.178,59.669 v1(167.829,59.669) ; v1(167.863,-0.575) T_IC5.3@167.863,0.33 ; T_IC4.2@168.528,3.284 v1(169.433,3.284) ; v1(169.133,-0.575) T_IC5.4@169.133,0.33 ; T_C16.1@169.658,13.977 v1(169.658,14.629) ; v1(170.226,-0.387) TP4.1@170.877,-0.387 ; TP4.1@171.565,-0.387 v1(172.217,-0.387) ; LD9.1@172.425,1.371 v1(172.425,2.022) ; T_C3.1@172.753,2.834 v1(173.404,2.834) ; T_C4.1@172.753,6.413 v1(173.354,6.413) v1@173.404,6.413 ; v1(173.311,11.45) T_T3.2@174.216,11.45 ; v1(173.311,14.927) T_T5.2@174.216,14.927 ; v1(174.078,-0.575) T_IC3.1@174.078,0.584 ; v1(175.348,-0.575) T_IC3.2@175.348,0.33 ; v1(176.618,-0.575) T_IC3.3@176.618,0.33 ; T_IC2.2@177.283,3.284 v1(178.189,3.284) ; v1(177.888,-0.575) T_IC3.4@177.888,0.33 ; v1(178.982,-0.387) TP5.1@179.633,-0.387 ; v1(179.195,11.45) T_T2.2@180.1,11.45 ; v1(179.195,14.927) T_T4.2@180.1,14.927 ; v1(179.977,-1.382) TP5.1@179.977,-0.731 ; LD2.1@181.025,1.371 v1(181.025,2.022) ; v1@182.83,6.392 T_C22.1@182.83,7.042 ; v1(185.9,6.391) T_C23.1@185.9,7.042 ; T_R19.1@187.42,4.4 v1(188.071,4.4)
  L1 w0.4: v1@29.409,41.975 CLIP6.1@30.913,41.975 ; v1@29.409,48.025 CLIP6.1@30.913,48.025 ; v1@29.409,76.855 CLIP1.1@30.913,76.855 ; v1@29.409,82.905 CLIP1.1@30.913,82.905 ; CLIP2.1@30.975,6.575 v1@32.479,6.575 ; CLIP2.1@30.975,12.625 v1@32.479,12.625 ; CLIP5.1@30.975,24.855 v1@32.479,24.855 ; CLIP5.1@30.975,30.905 v1@32.479,30.905 ; CLIP7.1@30.975,63.475 v1@32.479,63.475 ; CLIP7.1@30.975,69.525 v1@32.479,69.525 ; v1@35.419,88.345 CLIP18.1@35.419,89.849 ; CLIP13.1@36.419,-0.089 v1@36.419,1.415 ; v1@41.469,88.345 CLIP18.1@41.469,89.849 ; CLIP13.1@42.469,-0.089 v1@42.469,1.415 ; CLIP17.1@48.419,-0.089 v1@48.419,1.415 ; v1@49.669,88.345 CLIP8.1@49.669,89.849 ; CLIP17.1@54.469,-0.089 v1@54.469,1.415 ; v1@54.469,88.345 CLIP8.1@54.469,89.849 ; CLIP16.1@67.975,-0.089 v1@67.975,1.415 ; v1@67.975,88.345 CLIP9.1@67.975,89.849 ; CLIP16.1@74.025,-0.089 v1@74.025,1.415 ; v1@74.025,88.345 CLIP9.1@74.025,89.849 ; CLIP14.1@85.975,-0.089 v1@85.975,1.415 ; v1@85.975,88.345 CLIP10.1@85.975,89.849 ; v1@92.025,-1.655 CLIP14.1@92.025,-0.151 ; CLIP10.1@92.025,89.911 v1@92.025,91.415 ; C7A.2@95.953,83.506 v1(96.904,83.506) ; v1(98.944,33.655) C96.1@98.944,34.566 ; RN3.1@101.725,54.18 v1@102.825,54.18 ; v1@105.85,64.86 RN4.7@106.95,64.86 ; v1@109.409,4.855 CLIP15.1@110.913,4.855 ; v1@109.409,23.855 CLIP3.1@110.913,23.855 ; v1@109.409,50.905 CLIP12.1@110.913,50.905 ; v1@109.409,67.905 CLIP4.1@110.913,67.905 ; v1@109.409,79.855 CLIP11.1@110.913,79.855 ; CLIP15.1@110.975,10.905 v1@112.479,10.905 ; CLIP3.1@110.975,29.905 v1@112.479,29.905 ; CLIP12.1@110.975,44.855 v1@112.479,44.855 ; CLIP4.1@110.975,61.855 v1@112.479,61.855 ; IC27.4@131.381,15.192 v1@131.381,16.22
  L1 w0.5: v1(72.762,11.113) C8H.2@73.773,11.113 ; v1(72.762,21.113) C8G.2@73.773,21.113 ; v1(72.762,31.113) C8F.2@73.773,31.113 ; v1(72.762,41.113) C8E.2@73.773,41.113 ; v1(72.762,51.113) C8D.2@73.773,51.113 ; v1(72.762,71.113) C8B.2@73.773,71.113 ; v1(72.762,81.113) C8A.2@73.773,81.113 ; v1(72.775,61.069) C8C.2@73.786,61.069
  L1 w0.508: v1@65.385,7.54 v1@65.403,7.522 ; v1@65.385,15.761 v1@65.403,15.743 ; v1@65.385,17.54 v1@65.403,17.522 ; v1@65.385,25.761 v1@65.403,25.743 ; v1@65.385,27.54 v1@65.403,27.522 ; v1@65.385,35.761 v1@65.403,35.743 ; v1@65.385,37.54 v1@65.403,37.522 ; v1@65.385,45.761 v1@65.403,45.743 ; v1@65.385,47.54 v1@65.403,47.522 ; v1@65.385,65.761 v1@65.403,65.743 ; v1@65.385,67.54 v1@65.403,67.522 ; v1@65.385,75.761 v1@65.403,75.743 ; v1@65.385,77.54 v1@65.403,77.522 ; v1@65.394,5.761 v1@65.394,7.522 ; v1@65.394,15.761 v1@65.394,17.522 ; v1@65.394,25.761 v1@65.394,27.522 ; v1@65.394,35.761 65.394,37.522 C11E.1@65.394,36.63 ; v1@65.394,45.761 v1@65.394,47.522 ; v1@65.394,65.761 v1@65.394,67.522 ; v1@65.394,75.761 v1@65.394,77.522 ; v1@65.397,55.718 v1@65.416,55.699 ; v1@65.397,57.496 v1@65.416,57.478 ; v1@65.407,55.718 v1@65.407,57.478 ; C7C.2@95.898,63.78 v1(96.944,63.78) ; v1(102.433,30.12) C88.1@102.433,30.6 ; v1(103.93,30.12) 103.932,30.123 C87.1@103.932,30.6 ; v1(104.722,80.554) C32.1@105.202,80.554 ; v1(107.8,9.531) C33.1@107.8,10 ; v1(154.7,73.7) C53.1@154.7,72.8 v1(155.75,72.8) ; v1(156.425,72.8) C54.1@157.5,72.8 ; v1(156.45,63.2) C52.2@157.5,63.2 ; v1(157.5,61.875) C52.2@157.5,63.2 ; v1(157.5,73.7) C54.1@157.5,72.8 ; v1(158.55,72.8) C54.1@157.5,72.8 ; v1(158.575,63.2) C52.2@157.5,63.2 ; v1(164.95,66.125) C57.1@166,66.125 ; v1(166,65.225) C57.1@166,66.125 ; v1(167.075,66.125) C57.1@166,66.125 ; v1(181.475,55.4) C17.1@181.475,56.05 ; C23.1@182.127,21.12 182.177,21.17 IC11.2@182.177,22.42 ; C21.1@182.127,31.82 182.177,31.87 IC9.2@182.177,32.92 ; IC7.2@182.127,43.37 IC7.2@182.177,43.42 C16.1@182.177,42.17 ; C23.1@182.177,21.12 v1(182.827,21.12) ; IC10.2@182.177,27.67 182.177,26.37 v1(182.827,26.37) ; C21.1@182.177,31.62 v1(182.827,31.62) ; C20.1@182.177,36.87 v1(182.827,36.87) ; C20.1@182.177,36.92 IC8.2@182.177,38.17 ; C16.1@182.177,42.12 v1(182.827,42.12) ; C19.1@182.177,47.37 v1(182.827,47.37) ; C19.1@182.177,47.42 IC6.2@182.177,48.67
  L1 w0.762: v1(117.794,68.6) C51.1@119.319,68.6 ; v1(120.444,76.88) C49.1@121.294,76.88 ; v1(120.944,86.78) C48.1@121.794,86.78 ; C48.1@122.044,86.78 v1(122.044,87.63) ; C48.1@122.294,86.78 v1(123.144,86.78) ; v1(122.45,61.35) C59.1@123.3,61.35 ; v1(122.675,68.3) C60.1@123.525,68.3 ; v1(123.387,70.806) C50.2@123.387,72.006 ; C60.1@123.675,68.3 v1(124.525,68.3) ; C59.1@123.85,61.35 v1(124.7,61.35) ; C79.1@129.2,58.7 v1(129.2,59.55) ; v1(131.7,62.35) C58.1@131.7,63.2 ; C55.1@148.853,62.901 v1(149.62,62.901)
  L1 w1: T_D5.2@165.3,81.525 T_D5.2@165.85,80.975 ; v2(165.33,70.666) T_C10.1@165.33,71.95 ; T_D5.2@165.85,80.4 T_FL1.4@171.301,80.4 ; v2(167.73,70.65) T_C9.1@167.73,71.95 ; T_FL1.4@171.175,80.35 171.175,83.25 T_FL1.4@177.025,83.25 ; T_FL1.4@171.252,80.375 174.152,80.375 ; v2(174.775,71.005) T_FL1.4@174.775,73.05 ; T_FL1.4@176.964,83.336 176.964,85.023 ; 176.975,80.273 T_FL1.4@176.975,83.173
  other v1: 20.974,-2.031 92.025,-1.663 36.419,1.423 42.469,1.423 48.419,1.423 54.469,1.423 67.975,1.423 74.025,1.423 85.975,1.423 20.65,1.513 123.755,2.367 128.026,2.745 133,2.8 109.401,4.855 130.45,4.85 108.568,5.525 65.394,5.743 182.831,6.392 32.487,6.575 169.832,6.882 65.394,7.54 13.655,7.662 103.675,8.1 178.725,8.35 112.487,10.905 17.465,11.031 18.735,11.031 14.925,11.063 16.195,11.063 101.662,11.562 65.391,12.512 67.662,12.548 32.487,12.625 65.394,15.743 131.381,16.228 65.394,17.54 124.575,17.825 98.9,20.4 0.433,20.95 2.506,20.95 6.006,20.95 111.25,21.025 100.255,22.026 65.391,22.512 67.662,22.548 109.401,23.855 -0.997,24.85 2.503,24.85 6.003,24.85 32.487,24.855 65.394,25.743 65.394,27.54 202.802,29.104 204.001,29.104 97.366,29.907 112.487,29.905 200.067,30.424 201.494,30.424 202.802,30.531 204.001,30.531 32.487,30.905 200.067,31.623 201.494,31.623 97.366,32.139 65.391,32.512 67.662,32.548 101.914,34.665 103.014,34.665 104.114,34.665 105.214,34.665 65.394,35.743 101.914,35.765 103.014,35.765 104.114,35.765 106.314,35.765 201.398,36.574 202.825,36.574 158.122,36.741 101.914,36.865 103.014,36.865 105.214,36.865 106.314,36.865 0.438,37.05 2.512,37.05 6.012,37.05 65.394,37.54 201.398,37.773 202.825,37.773 101.914,37.965 103.014,37.965 104.114,37.965 105.214,37.965 106.314,37.965 197.66,38.099 199.087,38.099 158.122,38.168 101.914,39.065 103.014,39.065 104.114,39.065 105.214,39.065 106.314,39.065 197.66,39.298 199.087,39.298 101.914,40.165 103.014,40.165 104.114,40.165 105.214,40.165 106.314,40.165 0.433,40.95 2.506,40.95 6.006,40.95 163.622,41.241 29.401,41.975 97.369,42.1 65.391,42.512 67.662,42.548 163.622,42.668 203.7,43.5 209.56,43.5 215.419,43.5 8.613,43.738 158.122,44.24 -0.997,44.85 2.503,44.85 6.003,44.85 112.487,44.855 203.7,45.4 209.56,45.4 215.419,45.4 158.122,45.667 65.394,45.743 65.394,47.54 29.401,48.025 196.124,48.282 197.551,48.282 163.622,48.74 196.124,49.481 197.551,49.481 163.622,50.167 109.401,50.905 98.685,51.204 158.122,51.74 195.952,51.964 197.151,51.964 65.391,52.512 67.662,52.548 158.122,53.167 195.952,53.391 197.151,53.391 102.817,54.184 65.407,55.699 163.623,56.24 0.438,57.05 2.512,57.05 6.012,57.05 65.407,57.496 163.623,57.667 99.525,59 0.433,60.95 2.506,60.95 6.006,60.95 167.675,61.03 168.875,61.03 99.529,61.12 112.487,61.855 65.403,62.468 167.675,62.457 168.875,62.457 67.675,62.504 32.487,63.475 -0.997,64.85 2.503,64.85 6.003,64.85 105.858,64.864 65.394,65.743 65.394,67.54 109.401,67.905 104.214,68 101.798,68.43 118.394,68.6 32.487,69.525 104.214,69.616 65.391,72.512 67.662,72.548 65.394,75.743 29.401,76.855 65.394,77.54 16.791,78.31 19.331,78.317 20.601,78.317 13.605,78.912 109.401,79.855 22.495,81.588 167.175,82.455 168.425,82.455 65.391,82.512 67.662,82.548 29.401,82.905 165.925,83.705 167.175,83.705 168.425,83.705 169.675,83.705 170.925,83.705 15.5,84 167.175,84.955 168.425,84.955 169.675,84.955 170.925,84.955 18.685,87.519 19.955,87.519 21.225,87.519 22.495,87.519 35.419,88.337 41.469,88.337 49.669,88.337 54.469,88.337 67.975,88.337 74.025,88.337 85.975,88.337 15.206,91.268 92.025,91.423
  other v3: 136.641,59.095 136.641,60.87
IN_N0: IC18A.4 L1A.2 P1.2 P5.23 R8A.1 SW1A.1 | length 88.6
  L1 w0.199: P1.2@13.07,72.94 16.774,72.94 18.841,70.874 18.841,56.685 20.926,54.6 22.215,54.6 22.925,55.31 22.925,55.875 24.2,57.15 P5.23@24.2,58.15 24.35,58.15 26.2,60 26.2,72.506 27.607,73.914 31.914,73.914 32.975,74.975 32.975,80.975 33.133,81.133 34.03,81.133 SW1A.1@34.486,81.59 37.866,81.59 42.756,76.7 45.229,76.7 45.53,77.001 IC18A.4@45.53,77.17 ; IC18A.4@45.53,76.97 45.8,76.7 46.7,76.7 47.131,76.269 52.999,76.269 54.26,77.529 L1A.2@54.26,79.304 56.498,79.304 57.464,78.338 R8A.1@57.464,78.288
IN_N1: IC18B.4 J4.2 L1B.2 P5.20 R8B.1 SW1B.1 | length 106.9
  L1 w0.199: J4.2@4.44,74.94 J4.2@-0.64,74.94 J4.2@-0.64,69.86 J4.2@4.44,69.86 5.999,71.419 13.921,71.419 16.358,68.982 16.358,56.025 19.313,53.07 P5.20@21.66,53.07 22.68,52.05 24.767,52.05 28.925,56.208 28.925,70.927 29.904,71.905 32.741,71.905 33.066,71.58 33.903,71.58 33.913,71.59 37.866,71.59 42.756,66.7 45.229,66.7 45.53,67.001 IC18B.4@45.53,67.17 ; IC18B.4@45.53,66.97 45.8,66.7 46.7,66.7 47.131,66.269 52.999,66.269 54.26,67.53 L1B.2@54.26,69.304 56.498,69.304 57.464,68.338 R8B.1@57.464,68.288
IN_N2: IC18C.4 L1C.2 P1.6 P5.17 R8C.1 SW1C.1 | length 75.6
  L1 w0.199: P1.6@13.07,67.86 13.07,66.83 13.289,66.611 13.289,55.708 20.325,48.671 20.325,47.75 21.05,47.025 22.275,47.025 22.95,47.7 22.95,49.28 P5.17@24.2,50.53 26.564,50.53 32.657,56.623 32.657,61.232 33.015,61.59 SW1C.1@34.499,61.59 37.879,61.59 42.769,56.7 45.242,56.7 45.542,57.001 IC18C.4@45.542,57.17 ; IC18C.4@45.542,56.97 45.813,56.7 46.713,56.7 47.144,56.269 53.012,56.269 54.273,57.53 L1C.2@54.273,59.26 ; L1C.2@54.273,59.304 L1C.2@54.273,59.26 ; R8C.1@57.477,58.244 57.477,58.294 56.511,59.26 L1C.2@54.273,59.26
IN_N3: IC18D.4 J5.2 L1D.2 P5.14 R8D.1 SW1D.1 | length 80.8
  L1 w0.199: J5.2@4.44,54.94 J5.2@-0.64,54.94 J5.2@-0.64,49.86 J5.2@4.44,49.86 5.83,51.25 5.974,51.394 14.048,51.394 19.411,46.031 20.844,46.031 21.426,45.45 P5.14@21.66,45.45 21.671,45.45 22.663,44.458 24.858,44.458 25.825,45.425 25.825,46.673 29.402,50.25 31.725,50.25 33.065,51.59 37.866,51.59 42.756,46.7 45.229,46.7 45.53,47.001 IC18D.4@45.53,47.17 ; IC18D.4@45.53,46.97 45.8,46.7 46.7,46.7 47.131,46.269 52.999,46.269 54.26,47.53 L1D.2@54.26,49.304 56.498,49.304 57.464,48.338 R8D.1@57.464,48.288
IN_N4: IC18E.4 L1E.2 P2.2 P5.11 R8E.1 SW1E.1 | length 61.2
  L1 w0.199: P2.2@13.07,32.94 13.07,33.002 12.094,33.978 12.094,34.614 17.34,39.86 20.561,39.86 21.076,39.344 22.19,39.344 22.925,40.079 22.925,41.635 P5.11@24.2,42.91 25.527,42.91 29.231,39.206 32.143,39.206 33.366,40.429 33.366,41.124 SW1E.1@33.821,41.58 ; IC18E.4@45.53,36.97 45.8,36.7 46.7,36.7 47.131,36.269 52.999,36.269 54.26,37.53 L1E.2@54.26,39.304 56.498,39.304 57.464,38.338 R8E.1@57.464,38.288 ; IC18E.4@45.53,37.17 45.53,37.001 45.229,36.7 42.756,36.7 37.866,41.59 SW1E.1@34.486,41.59 ; SW1E.1@33.821,41.58 33.903,41.58 33.913,41.59 SW1E.1@34.486,41.59 ; SW1E.1@33.821,41.58 33.831,41.59 SW1E.1@34.486,41.59
IN_N5: IC18F.4 J6.2 L1F.2 P5.8 R8F.1 SW1F.1 | length 80.8
  L1 w0.199: J6.2@4.44,34.94 J6.2@-0.64,34.94 J6.2@-0.64,29.86 J6.2@4.44,29.86 5.992,31.412 14.087,31.412 17.2,34.525 20.475,37.8 21.63,37.8 P5.8@21.66,37.83 22.69,36.8 24.87,36.8 25.345,37.275 29.877,37.275 33.502,33.65 33.502,32.055 33.965,31.592 SW1F.1@34.486,31.592 ; SW1F.1@34.486,31.59 37.866,31.59 42.756,26.7 45.229,26.7 45.53,27 IC18F.4@45.53,27.17 ; IC18F.4@45.53,26.97 45.8,26.7 46.7,26.7 47.131,26.269 52.999,26.269 54.26,27.529 L1F.2@54.26,29.304 56.498,29.304 57.464,28.338 R8F.1@57.464,28.288
IN_N6: IC18G.4 L1G.2 P2.6 P5.5 R8G.1 SW1G.1 | length 65.8
  L1 w0.199: P2.6@13.07,27.86 13.285,27.86 13.876,28.451 15.437,28.451 19.161,32.175 20.5,32.175 20.925,31.75 22.325,31.75 22.925,32.35 22.925,34.165 24.05,35.29 P5.5@24.2,35.29 24.31,35.18 25.232,35.18 26.696,33.716 26.696,23.766 28.882,21.58 33.903,21.58 33.913,21.59 SW1G.1@34.486,21.59 37.866,21.59 42.756,16.7 45.229,16.7 45.53,17.001 IC18G.4@45.53,17.17 ; IC18G.4@45.53,16.97 45.8,16.7 46.7,16.7 47.131,16.269 52.999,16.269 54.26,17.53 L1G.2@54.26,19.304 56.498,19.304 57.464,18.338 R8G.1@57.464,18.288
IN_N7: IC18H.4 J7.2 L1H.2 P5.2 R8H.1 SW1H.1 | length 100.1
  L1 w0.199: J7.2@4.44,14.94 J7.2@-0.64,14.94 J7.2@-0.64,9.86 J7.2@4.44,9.86 6.355,11.775 9.252,11.775 ; 9.252,11.825 13.332,15.905 13.332,21.882 P5.2@21.66,30.21 22.519,29.351 22.519,19.806 26.821,15.504 32.181,15.504 33.45,14.235 33.45,12.055 33.916,11.59 SW1H.1@34.486,11.59 37.866,11.59 42.756,6.7 45.229,6.7 45.53,7.001 IC18H.4@45.53,7.17 ; IC18H.4@45.53,6.97 45.8,6.7 46.7,6.7 47.131,6.269 52.999,6.269 54.26,7.529 L1H.2@54.26,9.304 56.498,9.304 57.464,8.338 R8H.1@57.464,8.288
IN_P0: L1A.1 P1.1 P5.22 R1A.1 R5A.2 | length 88.7
  L1 w0.199: P1.1@10.53,72.94 10.68,72.94 11.69,73.95 16.489,73.95 19.367,71.072 19.367,56.914 20.628,55.653 21.617,55.653 P5.22@21.66,55.61 21.81,55.61 22.875,56.675 22.875,58.541 23.748,59.414 24.739,59.414 25.741,60.416 25.741,72.697 27.394,74.35 31.766,74.35 32.557,75.14 32.557,81.882 33.084,82.409 50.183,82.409 R5A.2@51.194,83.42 51.767,82.847 54.26,82.847 L1A.1@54.26,81.844 56.498,81.844 57.464,82.81 R1A.1@57.464,82.86
IN_P1: J4.1 L1B.1 P5.19 R1B.1 R5B.2 | length 89.8
  L1 w0.199: J4.1@1.9,72.4 5.387,72.4 5.9,71.887 14.25,71.887 16.922,69.215 16.922,56.259 19.104,54.076 23.194,54.076 P5.19@24.2,53.07 24.35,53.07 25.12,53.84 25.745,53.84 28.421,56.516 28.421,71.135 29.695,72.409 50.183,72.409 R5B.2@51.194,73.42 51.767,72.847 54.26,72.847 L1B.1@54.26,71.844 56.498,71.844 57.464,72.81 R1B.1@57.464,72.86
IN_P2: L1C.1 P1.5 P5.16 R1C.1 R5C.2 | length 75.8
  L1 w0.199: P1.5@10.53,67.86 10.68,67.86 11.72,68.9 13.7,68.9 14.3,68.3 14.3,67.103 13.85,66.653 13.85,55.943 21.66,48.133 P5.16@21.66,47.99 22.472,48.802 22.472,49.65 22.863,50.042 22.863,50.753 23.656,51.546 26.795,51.546 32.05,56.802 32.05,61.359 33.1,62.409 50.195,62.409 50.5,62.713 50.5,62.995 50.925,63.42 R5C.2@51.207,63.42 51.779,62.847 54.273,62.847 L1C.1@54.273,61.844 ; L1C.1@54.269,61.804 L1C.1@54.273,61.8 56.511,61.8 57.477,62.766 R1C.1@57.477,62.816
IN_P3: J5.1 L1D.1 P5.13 R1D.1 R5D.2 | length 64
  L1 w0.199: J5.1@1.9,52.4 4.736,52.4 5.405,52.4 5.892,51.913 14.263,51.913 19.626,46.55 23.1,46.55 P5.13@24.2,45.45 24.35,45.45 25.375,46.475 25.375,47.09 29.084,50.799 31.515,50.799 33.125,52.409 50.183,52.409 R5D.2@51.194,53.42 51.767,52.847 54.26,52.847 L1D.1@54.26,51.844 ; L1D.1@54.419,52.003 L1D.1@54.26,51.844 ; R1D.1@57.464,52.86 57.464,52.81 56.498,51.844 L1D.1@54.26,51.844
IN_P4: L1E.1 P2.1 P5.10 R1E.1 R5E.2 | length 58.7
  L1 w0.199: P2.1@10.53,32.94 10.544,32.94 11.126,33.521 11.126,33.536 11.583,33.993 11.583,34.825 17.128,40.37 P5.10@21.66,40.37 21.703,40.413 21.703,41.252 22.83,42.379 22.83,43.156 23.538,43.864 25.44,43.864 29.554,39.75 31.971,39.75 32.858,40.637 32.858,42.114 33.153,42.409 50.183,42.409 R5E.2@51.194,43.42 51.767,42.847 54.26,42.847 L1E.1@54.26,41.844 56.498,41.844 57.464,42.81 R1E.1@57.464,42.86
IN_P5: J6.1 L1F.1 P5.7 R1F.1 R5F.2 | length 63.5
  L1 w0.199: J6.1@1.9,32.4 5.462,32.4 6.013,31.849 13.746,31.849 16.65,34.752 20.223,38.325 20.45,38.325 20.975,38.85 23.18,38.85 P5.7@24.2,37.83 30.079,37.83 35.5,32.409 50.183,32.409 R5F.2@51.194,33.42 51.767,32.847 54.26,32.847 L1F.1@54.26,31.844 56.498,31.844 57.464,32.81 R1F.1@57.464,32.86
IN_P6: L1G.1 P2.5 P5.4 R1G.1 R5G.2 | length 65.2
  L1 w0.199: P2.5@10.53,27.86 10.68,27.86 11.77,28.95 15.101,28.95 18.901,32.75 P5.4@21.66,32.75 21.66,33.646 22.95,34.936 22.95,35.9 23.35,36.3 24.875,36.3 27.266,33.909 27.266,24.07 28.927,22.409 50.183,22.409 R5G.2@51.194,23.42 51.767,22.847 54.26,22.847 L1G.1@54.26,21.978 ; L1G.1@54.26,21.844 L1G.1@54.26,21.978 ; R1G.1@57.464,22.86 57.464,22.81 56.498,21.844 54.394,21.844 L1G.1@54.26,21.978
IN_P7: J7.1 L1H.1 P5.1 R1H.1 R5H.2 | length 85.6
  L1 w0.199: J7.1@1.9,12.4 7.587,12.4 9.075,12.4 ; 9.075,12.45 12.741,16.116 12.741,22.191 20.391,29.841 20.391,30.535 21.08,31.224 23.186,31.224 23.615,30.795 23.615,30.766 24.171,30.21 P5.1@24.2,30.21 23.119,29.129 23.119,20.081 27.136,16.064 32.413,16.064 33.975,14.502 33.975,12.925 34.491,12.409 50.183,12.409 R5H.2@51.194,13.42 51.767,12.847 54.26,12.847 L1H.1@54.26,11.844 ; L1H.1@54.269,11.853 L1H.1@54.26,11.844 ; R1H.1@57.464,12.86 57.464,12.81 56.498,11.844 L1H.1@54.26,11.844
INT_I2C_OE: T_IC9.5 T_R5.2 T_R6.2 | length 3
  L1 w0.152: T_IC9.5@128.6,3.12 128.6,2.745 128.695,2.65 129.33,2.65 129.52,2.46 T_R6.2@129.52,2 T_R5.2@129.52,0.9